# Altium PCB Octo-Electrode.PcbDoc (part 2 of 6)
Units mm, origin at the board's own origin, x right, y up, seen from the top; angles counter-clockwise.
Board outline 202.91 x 135.89 mm, 2 copper layers (Top Layer, Bottom Layer); 289 components, 165 nets, 790 pads, 510 vias.
Unrouted connection lines stored in the file: 83.
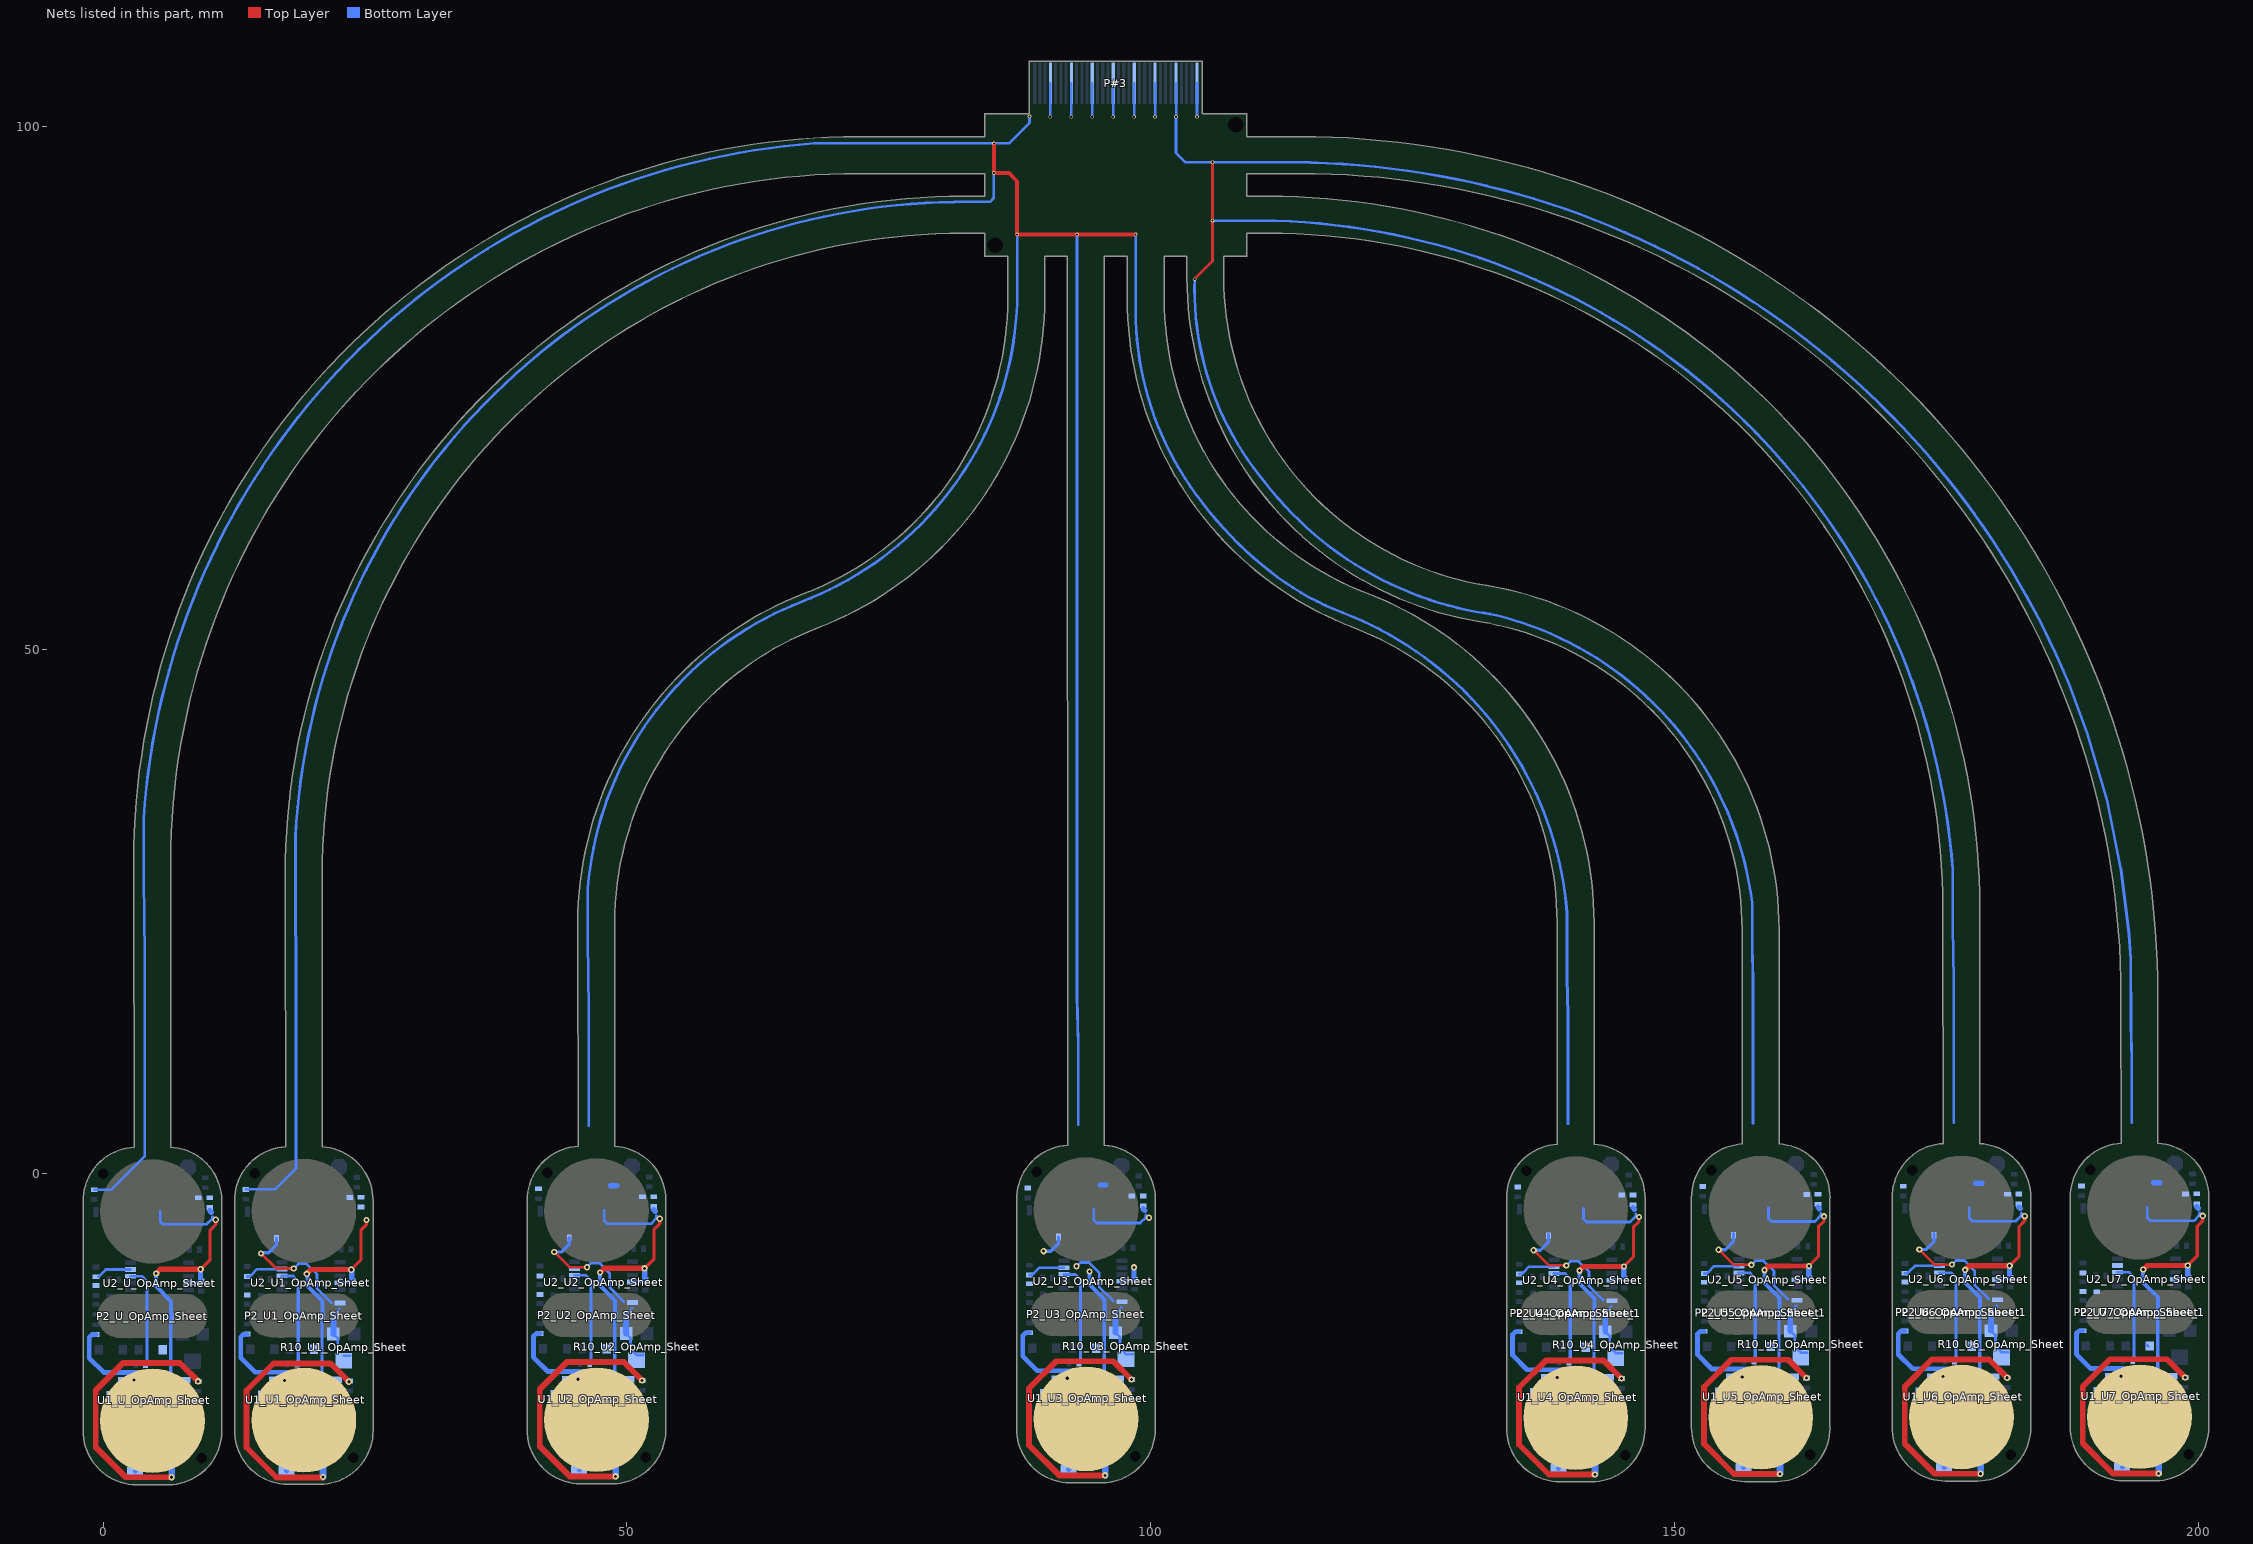
[diagram p2: the nets of this part, all layers, seen from the top]

## Components (designator, comment, footprint, x,y, rotation, side; value= is the part's Value field where it differs from the comment) (continued)
U2_U4_OpAmp_Sheet "TL084CPWR" 14-TSSOP 141.25,-10.172 r0 bottom locked (schematic designator U2)
U2_U5_OpAmp_Sheet "TL084CPWR" 14-TSSOP 158.911,-10.121 r0 bottom (schematic designator U2)
U2_U6_OpAmp_Sheet "TL084CPWR" 14-TSSOP 178.07,-10.096 r0 bottom locked (schematic designator U2)
U2_U7_OpAmp_Sheet "TL084CPWR" 14-TSSOP 195.069,-10.07 r0 bottom locked (schematic designator U2)
U2_U_OpAmp_Sheet "TL084CPWR" 14-TSSOP 5.384,-10.439 r0 bottom locked (schematic designator U2)

## Footprints (in the part's own frame and the unit in brackets; to place one, negate y for a bottom-side part, rotate by r counter-clockwise, add the part's x,y. Pads: shape width x height; smd on the part's side, far side on the other; paste and mask are expansions set on the pad)
14-TSSOP [mm]
  rect 1.05x0.45 smd: 1(-2.775,1.95) 2(-2.775,1.3) 3(-2.775,0.65) 4(-2.775,0) 5(-2.775,-0.65) 6(-2.775,-1.3) 7(-2.775,-1.95) 8(2.775,-1.95) 9(2.775,-1.3) 10(2.775,-0.65) 11(2.775,0) 12(2.775,0.65) 13(2.775,1.3) 14(2.775,1.95)
  silkscreen extent -3.58,-2.54 2.29,2.54, body extent -3.2,-2.5 3.2,2.5, height 1.2
"32 pin Ribbon Pads." [mm]
  rect 0.3x4 smd: 1(7.75,0) 2(7.25,0) 3(6.75,0) 4(6.25,0) 5(5.75,0) 6(5.25,0) 7(4.75,0) 8(4.25,0) 9(3.75,0) 10(3.25,0) 11(2.75,0) 12(2.25,0) 13(1.75,0) 14(1.25,0) 15(0.75,0) 16(0.25,0) 17(-0.25,0) 18(-0.75,0) 19(-1.25,0) 20(-1.75,0) 21(-2.25,0) 22(-2.75,0) 23(-3.25,0) 24(-3.75,0) 25(-4.25,0) 26(-4.75,0) 27(-5.25,0) 28(-5.75,0) 29(-6.25,0) 30(-6.75,0) 31(-7.25,0) 32(-7.75,0)
  silkscreen extent -8.04,-2.54 8.04,2.01
Cap-0402 [mil]
  rect 18x25 smd mask+2.36: 1(-18.5,0) 2(18.5,0)
  silkscreen extent -31,-16 31,16, body extent -20,-10 20,10, height 19
LED-0603 [mm]
  rect 0.5x1 smd: 1(-0.75,0) 2(0.75,0)
  silkscreen extent -1.12,-0.66 1.75,0.66, body extent -0.82,-0.37 0.82,0.36, height 0.68
Res-0402 [mil]
  rect 18x25 smd mask+2.17: 1(-18.5,0) 2(18.5,0)
  silkscreen extent -32,-17 32,16, body extent -23,-11 23,11, height 16
sEMG-sensor [mm]
  round 10 smd: 1(0,9.987) 2(0,-9.987)
  oval 10.5x4.2 smd: 3(0,-0.013)
  silkscreen extent -5.68,-15.21 5.68,15.21
SOD-323 [mm]
  rect 0.8x0.9 smd mask+0.055: 1(-1.15,0) 2(1.15,0)
  silkscreen extent -2.01,-0.79 0.94,0.79, body extent -1.3,-0.67 1.3,0.67, height 1.1
SOIC-8 [mm]
  rect 1.55x0.6 smd: 1(-2.7,1.905) 2(-2.7,0.635) 3(-2.7,-0.635) 4(-2.7,-1.905) 5(2.7,-1.905) 6(2.7,-0.635) 7(2.7,0.635) 8(2.7,1.905)
  silkscreen extent -3.76,-2.49 1.99,2.49, body extent -3,-2.45 3,2.45, height 1.7
"Solder Bridge 0402" [mil]
  rect 18x25 smd mask+2.17: 1(-18.5,0) 2(18.5,0)
  silkscreen extent -32,-17 32,16
TC33X-2-104E_ [mm]
  rect 1.2x1.2 smd: 1(0,0) 3(2,0)
  rect 1.6x1.5 smd: 2(1,2.55)
  silkscreen extent -1.09,-0.71 2.83,3.15, body extent -0.76,-0.64 2.84,3.32, height 1.13
Test-point [mil]
  oct 60x60 smd: 1(0,0)
  silkscreen extent -37,-37 37,37

## Part data
C1_U1_OpAmp_Sheet C1_U2_OpAmp_Sheet C1_U3_OpAmp_Sheet C1_U4_OpAmp_Sheet C1_U5_OpAmp_Sheet C1_U6_OpAmp_Sheet C1_U7_OpAmp_Sheet C1_U7_OpAmp_Sheet_1 C1_U_OpAmp_Sheet C4_U1_OpAmp_Sheet C4_U2_OpAmp_Sheet C4_U3_OpAmp_Sheet C4_U4_OpAmp_Sheet C4_U5_OpAmp_Sheet C4_U6_OpAmp_Sheet C4_U7_OpAmp_Sheet C4_U7_OpAmp_Sheet_1 C4_U_OpAmp_Sheet C6_U1_OpAmp_Sheet C6_U2_OpAmp_Sheet C6_U3_OpAmp_Sheet C6_U4_OpAmp_Sheet C6_U5_OpAmp_Sheet C6_U6_OpAmp_Sheet C6_U7_OpAmp_Sheet C6_U7_OpAmp_Sheet_1 C6_U_OpAmp_Sheet: library part CC0402KRX5R7BB105, "CAP CER 1UF 16V X5R 0402", Case Code (Imperial)=0402, Case Code (Metric)=1005, Dielectric=X5R, LCSC Part Number=C325464, Manufacturer=Yageo, Max Operating Temperature=85°C, Min Operating Temperature=-55°C, Supplier Part Number 1=311-1691-6-ND, Tolerance=10%, Voltage Rating=16V, Capacitance=1uF, Case/Package=0402, ComponentLink1Description=http://www.yageo.com/documents/recent/UPY-GPHC_X5R_4V-to-50V_12.pdf?src-supplier=Avnet+Europe, ComponentLink1URL=http://www.yageo.com/documents/recent/UPY-GPHC_X5R_4V-to-50V_12.pdf?src-supplier=Avnet+Europe, Composition=Ceramic, Depth=0.5mm, Halogen Free="Halogen Free", Height=0.5mm, Item Type=Capacitor, Lead Free="Lead Free", Length=1mm, Manufacturer Part Number=CC0402KRX5R7BB105, Mount="Surface Mount", Packaging="Tape and Reel", Pricing 1="1=0.36, 10=0.252, 100=0.1512, 500=0.1134, 1000=0.09576, 2500=0.09072, 5000=0.08568 (USD)", Radiation Hardening=No, Stock 1=1405667, Supplier 1=Digi-Key, Termination=SMD/SMT, Thickness=0.022inch, Voltage Rating (DC)=16V, Weight=2.3E-05oz, Width=0.02inch
C2_U1_OpAmp_Sheet C2_U2_OpAmp_Sheet C2_U3_OpAmp_Sheet C2_U4_OpAmp_Sheet C2_U5_OpAmp_Sheet C2_U6_OpAmp_Sheet C2_U7_OpAmp_Sheet C2_U7_OpAmp_Sheet_1 C2_U_OpAmp_Sheet C5_U1_OpAmp_Sheet C5_U2_OpAmp_Sheet C5_U3_OpAmp_Sheet C5_U4_OpAmp_Sheet C5_U5_OpAmp_Sheet C5_U6_OpAmp_Sheet C5_U7_OpAmp_Sheet C5_U7_OpAmp_Sheet_1 C5_U_OpAmp_Sheet: library part GRM155R71H104ME14D, "CAP CER 0.1UF 50V X7R 0402", Capacitance=100nF, Case/Package=0402, LCSC Part Number=C182412, Manufacturer=Murata, Max Operating Temperature=125°C, Min Operating Temperature=-55°C, Tolerance=20%, Voltage Rating=50V, Category="Ceramic Capacitors", ComponentLink1Description=http://www.mouser.com/ds/2/281/c02e-2905.pdf?src-supplier=Mouser, ComponentLink1URL=http://www.mouser.com/ds/2/281/c02e-2905.pdf?src-supplier=Mouser, ComponentLink2Description=http://search.murata.co.jp/Ceramy/image/img/A01X/G101/ENG/GRM155R71H104ME14-01.pdf?src-supplier=Digi-Key, ComponentLink2URL=http://search.murata.co.jp/Ceramy/image/img/A01X/G101/ENG/GRM155R71H104ME14-01.pdf?src-supplier=Digi-Key, ComponentLink3Description=http://psearch.en.murata.com/capacitor/product/GRM155R71H104ME14%23.pdf?src-supplier=Avnet, ComponentLink3URL=http://psearch.en.murata.com/capacitor/product/GRM155R71H104ME14%23.pdf?src-supplier=Avnet, Item Type=Capacitor, Length=0.039inch, Manufacturer Part Number=GRM155R71H104ME14D, Mount="Surface Mount", Packaging="Cut Tape", Pricing 1="10000=0.00444, 20000=0.00420, 40000=0.00396, 60000=0.00372, 80000=0.00348, 100000=0.00324, 1000000=0.00300 (USD)", RoHS=Yes, RoHS Compliant=Yes, Stock 1=100000, Supplier 1=Avnet, Supplier Part Number 1=GRM155R71H104ME14D, Thickness=0.022inch, Width=0.02inch
C3_U1_OpAmp_Sheet C3_U2_OpAmp_Sheet C3_U3_OpAmp_Sheet C3_U4_OpAmp_Sheet C3_U5_OpAmp_Sheet C3_U6_OpAmp_Sheet C3_U7_OpAmp_Sheet C3_U_OpAmp_Sheet: library part CC0402KRX7R9BB103, "CAP CER 10000PF 50V X7R 0402", Case Code (Imperial)=0402, Case Code (Metric)=1005, Dielectric=X7R, LCSC Part Number=C60133, Manufacturer=Yageo, Max Operating Temperature=125°C, Min Operating Temperature=-55°C, Package Quantity=1, Resistor Type=Ceramic, Tolerance=10%, Voltage=50V, Capacitance=10nF, Case/Package=0402, Category="Ceramic Capacitors", ComponentLink1Description=https://datasheet.ciiva.com/11788/0900766b8079c870-11788375.pdf?src-supplier=RSComponents, ComponentLink1URL=https://datasheet.ciiva.com/11788/0900766b8079c870-11788375.pdf?src-supplier=RSComponents, ComponentLink2Description=https://datasheet.ciiva.com/26862/getdatasheetpartid-138248-26862642.pdf?src-supplier=Verical, ComponentLink2URL=https://datasheet.ciiva.com/26862/getdatasheetpartid-138248-26862642.pdf?src-supplier=Verical, ComponentLink3Description=https://datasheet.ciiva.com/7978/1489800-7978093.pdf?src-supplier=Element14, ComponentLink3URL=https://datasheet.ciiva.com/7978/1489800-7978093.pdf?src-supplier=Element14, ComponentLink4Description=https://datasheet.ciiva.com/28450/1489800-28450377.pdf?src-supplier=Element14, ComponentLink4URL=https://datasheet.ciiva.com/28450/1489800-28450377.pdf?src-supplier=Element14, ComponentLink5Description=https://datasheet.ciiva.com/176/mlccorderingcode-176349.pdf?src-supplier=Digi-Key, ComponentLink5URL=https://datasheet.ciiva.com/176/mlccorderingcode-176349.pdf?src-supplier=Digi-Key, ComponentLink6Description=https://datasheet.ciiva.com/176/mlccorderingcode-176348.pdf?src-supplier=Digi-Key, ComponentLink6URL=https://datasheet.ciiva.com/176/mlccorderingcode-176348.pdf?src-supplier=Digi-Key, ComponentLink7Description=https://datasheet.ciiva.com/176/mlccorderingcode-176350.pdf?src-supplier=Digi-Key, ComponentLink7URL=https://datasheet.ciiva.com/176/mlccorderingcode-176350.pdf?src-supplier=Digi-Key, Depth=0.5mm, Halogen Free="Halogen Free", Height=0.5mm, Item Type=Capacitor, Lead Free="Lead Free", Length=1mm, Manufacturer Part Number=CC0402KRX7R9BB103, Mount="Surface Mount", Packaging="Tape and Reel", Pricing 1="10000=0.00178 (USD)", Radiation Hardening=No, Reach SVHC Compliant=Yes, RoHS=Yes, RoHS Compliant=Yes, Series=CC, Stock 1=995000, Supplier 1=Avnet, Supplier Part Number 1=CC0402KRX7R9BB103, Termination=SMD/SMT, Thickness=0.022inch, Voltage Rating=50V, Voltage Rating (DC)=50V, Width=0.02inch
D1_U1_OpAmp_Sheet D1_U2_OpAmp_Sheet D1_U3_OpAmp_Sheet D1_U4_OpAmp_Sheet D1_U5_OpAmp_Sheet D1_U6_OpAmp_Sheet D1_U7_OpAmp_Sheet D1_U_OpAmp_Sheet D2_U1_OpAmp_Sheet D2_U2_OpAmp_Sheet D2_U3_OpAmp_Sheet D2_U4_OpAmp_Sheet D2_U5_OpAmp_Sheet D2_U6_OpAmp_Sheet D2_U7_OpAmp_Sheet D2_U_OpAmp_Sheet: "DIODE GEN PURP 75V 150MA SOD323", Average Rectified Current=150mA, Capacitance=2pF, Forward Current=300mA, Forward Voltage=1.25V, LCSC Part Number=C60580, Manufacturer=Diodes, Max Forward Surge Current (Ifsm)=2A, Max Operating Temperature=150°C, Max Repetitive Reverse Voltage (Vrrm)=75V, Max Reverse Current=1uA, Min Operating Temperature=-65°C, Package Quantity=3000, Power Dissipation=200mW, Supplier Part Number 1=621-1N4148WS-F, Category="Rectifier Diodes", ComponentLink1Description=https://datasheet.ciiva.com/1179/ds30097-1179355.pdf?src-supplier=Element14, ComponentLink1URL=https://datasheet.ciiva.com/1179/ds30097-1179355.pdf?src-supplier=Element14, ComponentLink2Description=https://datasheet.ciiva.com/8300/ds30097-8300396.pdf?src-supplier=Avnet, ComponentLink2URL=https://datasheet.ciiva.com/8300/ds30097-8300396.pdf?src-supplier=Avnet, ComponentLink3Description=https://datasheet.ciiva.com/16199/ds30097-16199061.pdf?src-supplier=Future+Electronics, ComponentLink3URL=https://datasheet.ciiva.com/16199/ds30097-16199061.pdf?src-supplier=Future+Electronics, ComponentLink4Description=https://datasheet.ciiva.com/911/ds30097-911742.pdf?src-supplier=Digi-Key, ComponentLink4URL=https://datasheet.ciiva.com/911/ds30097-911742.pdf?src-supplier=Digi-Key, ComponentLink5Description=https://datasheet.ciiva.com/911/ds30097-911743.pdf?src-supplier=Digi-Key, ComponentLink5URL=https://datasheet.ciiva.com/911/ds30097-911743.pdf?src-supplier=Digi-Key, ComponentLink6Description=https://datasheet.ciiva.com/911/ds30097-911741.pdf?src-supplier=Digi-Key, ComponentLink6URL=https://datasheet.ciiva.com/911/ds30097-911741.pdf?src-supplier=Digi-Key, Contact Plating=Tin,Matte, Current Rating=150mA, Element Configuration=Single, Height=1mm, Item Type=Diode, Lead Free="Lead Free", Length=1.8mm, Manufacturer Part Number=1N4148WS-7-F, Max Reverse Voltage (DC)=75V, Max Surge Current=2A, Mount="Surface Mount", Number of Pins=2, Output Current=150mA, Packaging="Tape and Reel", Peak Non-Repetitive Surge Current=2A, Polarity=Standard, Power Rating=200mW, Pricing 1="1=0.19000, 10=0.17500, 50=0.17500, 100=0.09600, 500=0.05900, 1000=0.04000, 3000=0.03000, 9000=0.02600, 10000=0.02600, 24000=0.02300, 45000=0.01900 (USD)", Radiation Hardening=No, REACH SVHC="No SVHC", Recovery Time=4ns, Reverse Recovery Time=4ns, Reverse Recovery Time-Max=4ns, RoHS=Yes, RoHS Compliant=Yes, Series=-, Supplier 1=Mouser, Voltage=75V, Voltage Rating (DC)=75V, Weight=0.000173oz, Width=1.4mm
LED1_U1_OpAmp_Sheet LED1_U2_OpAmp_Sheet LED1_U3_OpAmp_Sheet LED1_U4_OpAmp_Sheet LED1_U5_OpAmp_Sheet LED1_U6_OpAmp_Sheet LED1_U7_OpAmp_Sheet LED1_U7_OpAmp_Sheet_1 LED1_U_OpAmp_Sheet: library part 19-217/S2C-AQ1R1B/3T, "0603(H=0.4mm) λD=600.5~612.5nm VR=5V VF=1.7V~2.2V IF=25mA PD=60mW", LCSC Part Number=C146215, Manufacturer=Everlight, Supplier Part Number 1=1080-19-217/S2C-AQ1R1B/3TTR-ND, Category=LEDs, ComponentLink1Description=LCSC, ComponentLink1URL=https://www.lcsc.com/product-detail/Light-Emitting-Diodes-LED_Everlight-Elec-19-217-S2C-AQ1R1B-3T_C146215.html, Item Type=LED, Manufacturer Part Number=19-217/S2C-AQ1R1B/3T, RoHS=No, Supplier 1=Digi-Key
P1_U1_OpAmp_Sheet P1_U2_OpAmp_Sheet P1_U3_OpAmp_Sheet P1_U4_OpAmp_Sheet P1_U5_OpAmp_Sheet P1_U6_OpAmp_Sheet P1_U7_OpAmp_Sheet P1_U_OpAmp_Sheet P3_U1_OpAmp_Sheet P3_U2_OpAmp_Sheet P3_U3_OpAmp_Sheet P3_U4_OpAmp_Sheet P3_U5_OpAmp_Sheet P3_U6_OpAmp_Sheet P3_U7_OpAmp_Sheet P3_U_OpAmp_Sheet: library part "TEST POINT", "Test Point ON", Item Type="TEST POINT"
P2_U1_OpAmp_Sheet P2_U2_OpAmp_Sheet P2_U3_OpAmp_Sheet P2_U4_OpAmp_Sheet P2_U4_OpAmp_Sheet_1 P2_U5_OpAmp_Sheet P2_U5_OpAmp_Sheet_1 P2_U6_OpAmp_Sheet P2_U6_OpAmp_Sheet_1 P2_U7_OpAmp_Sheet P2_U7_OpAmp_Sheet_1 P2_U_OpAmp_Sheet: "Sensor Connecting Pads"
P#3: "Ribbon wire Connection Pads"
R1_U1_OpAmp_Sheet R1_U2_OpAmp_Sheet R1_U3_OpAmp_Sheet R1_U4_OpAmp_Sheet R1_U5_OpAmp_Sheet R1_U6_OpAmp_Sheet R1_U7_OpAmp_Sheet R1_U7_OpAmp_Sheet_1 R1_U_OpAmp_Sheet R11_U1_OpAmp_Sheet R11_U2_OpAmp_Sheet R11_U3_OpAmp_Sheet R11_U4_OpAmp_Sheet R11_U5_OpAmp_Sheet R11_U6_OpAmp_Sheet R11_U7_OpAmp_Sheet R11_U7_OpAmp_Sheet_1 R11_U_OpAmp_Sheet: library part RC0402JR-071KL, "RES 1K OHM 5% 1/16W 0402", Case Code (Imperial)=0402, Case Code (Metric)=1005, LCSC Part Number=C105637, Manufacturer=Yageo, Max Operating Temperature=155°C, Max Power Dissipation=63mW, Min Operating Temperature=-55°C, Package Quantity=1, Power Rating=62.5mW, Resistance=1kR, Resistance Tolerance=5%, Resistor Type="Thick Film", Supplier Part Number 1=311-1.0KJRCT-ND, Temperature Coefficient=100ppm/°C, Voltage Rating=50V, Case/Package=0402, Category="Chip SMD Resistors", ComponentLink1Description=https://datasheet.ciiva.com/7983/1018594-7983558.pdf?src-supplier=Element14, ComponentLink1URL=https://datasheet.ciiva.com/7983/1018594-7983558.pdf?src-supplier=Element14, ComponentLink2Description=https://datasheet.ciiva.com/2452/pyu-r-int-thick-7-2452756.pdf?src-supplier=Digi-Key, ComponentLink2URL=https://datasheet.ciiva.com/2452/pyu-r-int-thick-7-2452756.pdf?src-supplier=Digi-Key, ComponentLink3Description=https://datasheet.ciiva.com/2452/pyu-r-int-thick-7-2452757.pdf?src-supplier=Digi-Key, ComponentLink3URL=https://datasheet.ciiva.com/2452/pyu-r-int-thick-7-2452757.pdf?src-supplier=Digi-Key, ComponentLink4Description=https://datasheet.ciiva.com/2452/pyu-r-int-thick-7-2452755.pdf?src-supplier=Digi-Key, ComponentLink4URL=https://datasheet.ciiva.com/2452/pyu-r-int-thick-7-2452755.pdf?src-supplier=Digi-Key, ComponentLink5Description=https://datasheet.ciiva.com/7850/1018594-7850170.pdf?src-supplier=Element14, ComponentLink5URL=https://datasheet.ciiva.com/7850/1018594-7850170.pdf?src-supplier=Element14, ComponentLink6Description=https://datasheet.ciiva.com/7850/1018594-7850171.pdf?src-supplier=Element14, ComponentLink6URL=https://datasheet.ciiva.com/7850/1018594-7850171.pdf?src-supplier=Element14, ComponentLink7Description=https://datasheet.ciiva.com/17081/pyu-rc0402-51-rohs-l-6-r-17081438.pdf?src-supplier=Future+Electronics, ComponentLink7URL=https://datasheet.ciiva.com/17081/pyu-rc0402-51-rohs-l-6-r-17081438.pdf?src-supplier=Future+Electronics, Construction=Rectangular, Depth=0.5mm, Features="Moisture Resistant", Height=0.016inch, Item Type=Resistor, Lead Free="Lead Free", Length=0.039inch, Manufacturer Part Number=RC0402JR-071KL, Military Standard=Not, Number of Terminations=2, Packaging="Tape and Reel", Pricing 1="1=0.10000, 10=0.01300, 100=0.00540, 1000=0.00244, 2500=0.00212, 5000=0.00175 (USD)", REACH SVHC="No SVHC", RoHS=Yes, RoHS Compliant=Yes, Series=RC, Size Code=0402, Stock 1=452315, Supplier 1=Digi-Key, Termination=SMD/SMT, Tolerance=5%, Width=0.02inch
R2_U1_OpAmp_Sheet R2_U2_OpAmp_Sheet R2_U3_OpAmp_Sheet R2_U4_OpAmp_Sheet R2_U5_OpAmp_Sheet R2_U6_OpAmp_Sheet R2_U7_OpAmp_Sheet R2_U_OpAmp_Sheet: library part RC0402FR-07240RL, "RES 240 OHM 1% 1/16W 0402", Case Code (Imperial)=0402, Case Code (Metric)=1005, Manufacturer=Yageo, Max Operating Temperature=155°C, Max Power Dissipation=63mW, Min Operating Temperature=-55°C, Package Quantity=1, Resistance Tolerance=1%, Resistor Type="Thick Film", Supplier Part Number 1=603-RC0402FR-07240RL, Temperature Coefficient=100ppm/°C, Voltage Rating=50V, Case/Package=0402, Category="Chip SMD Resistors", ComponentLink1Description=https://datasheet.ciiva.com/7849/1018594-7849915.pdf?src-supplier=Element14, ComponentLink1URL=https://datasheet.ciiva.com/7849/1018594-7849915.pdf?src-supplier=Element14, ComponentLink2Description=https://datasheet.ciiva.com/7849/1018594-7849916.pdf?src-supplier=Element14, ComponentLink2URL=https://datasheet.ciiva.com/7849/1018594-7849916.pdf?src-supplier=Element14, ComponentLink3Description=https://datasheet.ciiva.com/2519/pyu-r-int-thick-7-2519157.pdf?src-supplier=Digi-Key, ComponentLink3URL=https://datasheet.ciiva.com/2519/pyu-r-int-thick-7-2519157.pdf?src-supplier=Digi-Key, ComponentLink4Description=https://datasheet.ciiva.com/2519/pyu-r-int-thick-7-2519158.pdf?src-supplier=Digi-Key, ComponentLink4URL=https://datasheet.ciiva.com/2519/pyu-r-int-thick-7-2519158.pdf?src-supplier=Digi-Key, ComponentLink5Description=https://datasheet.ciiva.com/2519/pyu-r-int-thick-7-2519156.pdf?src-supplier=Digi-Key, ComponentLink5URL=https://datasheet.ciiva.com/2519/pyu-r-int-thick-7-2519156.pdf?src-supplier=Digi-Key, ComponentLink6Description=https://datasheet.ciiva.com/12669/pyu-rc0402-51-rohs-l-6-r-12669689.pdf?src-supplier=Mouser, ComponentLink6URL=https://datasheet.ciiva.com/12669/pyu-rc0402-51-rohs-l-6-r-12669689.pdf?src-supplier=Mouser, ComponentLink7Description=https://datasheet.ciiva.com/17419/pyu-rc0402-51-rohs-l-6-r-17419482.pdf?src-supplier=Future+Electronics, ComponentLink7URL=https://datasheet.ciiva.com/17419/pyu-rc0402-51-rohs-l-6-r-17419482.pdf?src-supplier=Future+Electronics, Construction=Rectangular, Depth=0.5mm, Features="Moisture Resistant", Height=0.016inch, Lead Free="Lead Free", Length=1mm, Manufacturer Part Number=RC0402FR-07240RL, Military Standard=Not, Number of Terminations=2, Packaging="Tape and Reel", Power Rating=63mW, Pricing 1="1=0.10000, 10=0.01200, 50=0.01200, 100=0.00500, 1000=0.00300, 10000=0.00100 (USD)", REACH SVHC=Unknown, Resistance=240R, RoHS=Yes, RoHS Compliant=Yes, Series=RC, Size Code=0402, Stock 1=1903202, Supplier 1=Mouser, Termination=SMD/SMT, Tolerance=1%, Voltage Rating (DC)=50V, Width=0.02inch
R3_U1_OpAmp_Sheet R3_U2_OpAmp_Sheet R3_U3_OpAmp_Sheet R3_U4_OpAmp_Sheet R3_U5_OpAmp_Sheet R3_U6_OpAmp_Sheet R3_U7_OpAmp_Sheet R3_U_OpAmp_Sheet R4_U1_OpAmp_Sheet R4_U2_OpAmp_Sheet R4_U3_OpAmp_Sheet R4_U4_OpAmp_Sheet R4_U5_OpAmp_Sheet R4_U6_OpAmp_Sheet R4_U7_OpAmp_Sheet R4_U7_OpAmp_Sheet_1 R4_U_OpAmp_Sheet R5_U1_OpAmp_Sheet R5_U2_OpAmp_Sheet R5_U3_OpAmp_Sheet R5_U4_OpAmp_Sheet R5_U5_OpAmp_Sheet R5_U6_OpAmp_Sheet R5_U7_OpAmp_Sheet R5_U_OpAmp_Sheet R6_U1_OpAmp_Sheet R6_U2_OpAmp_Sheet R6_U3_OpAmp_Sheet R6_U4_OpAmp_Sheet R6_U5_OpAmp_Sheet R6_U6_OpAmp_Sheet R6_U7_OpAmp_Sheet R6_U_OpAmp_Sheet R7_U1_OpAmp_Sheet R7_U2_OpAmp_Sheet R7_U3_OpAmp_Sheet R7_U4_OpAmp_Sheet R7_U5_OpAmp_Sheet R7_U6_OpAmp_Sheet R7_U7_OpAmp_Sheet R7_U7_OpAmp_Sheet_1 R7_U_OpAmp_Sheet: library part RC0402JR-07150KL, "RES SMD 0402 150kOhm 5% Paper T/R", Case Code (Imperial)=0402, Case Code (Metric)=1005, LCSC Part Number=C137919, Manufacturer=Yageo, Max Operating Temperature=155°C, Max Power Dissipation=63mW, Min Operating Temperature=-55°C, Package Quantity=1, Resistance=150kR, Resistance Tolerance=5%, Resistor Type="Thick Film", Temperature Coefficient=100ppm/°C, Voltage Rating=50V, Case/Package=0402, Category="Chip SMD Resistors", ComponentLink1Description=https://datasheet.ciiva.com/7983/1018594-7983551.pdf?src-supplier=Element14, ComponentLink1URL=https://datasheet.ciiva.com/7983/1018594-7983551.pdf?src-supplier=Element14, ComponentLink2Description=https://datasheet.ciiva.com/2518/pyu-r-int-thick-7-2518929.pdf?src-supplier=Digi-Key, ComponentLink2URL=https://datasheet.ciiva.com/2518/pyu-r-int-thick-7-2518929.pdf?src-supplier=Digi-Key, ComponentLink3Description=https://datasheet.ciiva.com/2518/pyu-r-int-thick-7-2518930.pdf?src-supplier=Digi-Key, ComponentLink3URL=https://datasheet.ciiva.com/2518/pyu-r-int-thick-7-2518930.pdf?src-supplier=Digi-Key, ComponentLink4Description=https://datasheet.ciiva.com/2518/pyu-r-int-thick-7-2518928.pdf?src-supplier=Digi-Key, ComponentLink4URL=https://datasheet.ciiva.com/2518/pyu-r-int-thick-7-2518928.pdf?src-supplier=Digi-Key, ComponentLink5Description=https://datasheet.ciiva.com/7850/1018594-7850149.pdf?src-supplier=Element14, ComponentLink5URL=https://datasheet.ciiva.com/7850/1018594-7850149.pdf?src-supplier=Element14, ComponentLink6Description=https://datasheet.ciiva.com/17072/pyu-rc0402-51-rohs-l-6-r-17072379.pdf?src-supplier=Future+Electronics, ComponentLink6URL=https://datasheet.ciiva.com/17072/pyu-rc0402-51-rohs-l-6-r-17072379.pdf?src-supplier=Future+Electronics, ComponentLink7Description=https://datasheet.ciiva.com/15189/getdatasheetpartid-251830-15189543.pdf?src-supplier=Verical, ComponentLink7URL=https://datasheet.ciiva.com/15189/getdatasheetpartid-251830-15189543.pdf?src-supplier=Verical, Construction=Rectangular, Depth=0.5mm, Features="Moisture Resistant", Height=0.016inch, Item Type=Resistor, Lead Free="Lead Free", Length=1mm, Manufacturer Part Number=RC0402JR-07150KL, Military Standard=Not, Number of Terminations=2, Packaging="Tape and Reel", Power Rating=63mW, Pricing 1="10000=0.00100 (USD)", REACH SVHC="No SVHC", RoHS=Yes, RoHS Compliant=Yes, Series=RC, Size Code=0402, Stock 1=170000, Supplier 1="Arrow Electronics", Supplier Part Number 1=RC0402JR-07150KL, Termination=SMD/SMT, Tolerance=5%, Weight=2.3E-05oz, Width=0.02inch
R8_U1_OpAmp_Sheet R8_U2_OpAmp_Sheet R8_U3_OpAmp_Sheet R8_U4_OpAmp_Sheet R8_U5_OpAmp_Sheet R8_U6_OpAmp_Sheet R8_U7_OpAmp_Sheet R8_U7_OpAmp_Sheet_1 R8_U_OpAmp_Sheet R9_U1_OpAmp_Sheet R9_U2_OpAmp_Sheet R9_U3_OpAmp_Sheet R9_U4_OpAmp_Sheet R9_U5_OpAmp_Sheet R9_U6_OpAmp_Sheet R9_U7_OpAmp_Sheet R9_U7_OpAmp_Sheet_1 R9_U_OpAmp_Sheet: library part RC-02W8062FT, "1/16W 50V ±1% ±200ppm/℃ -55℃~+155℃ 80.6kΩ 0402 Chip Resistor - Surface Mount ROHS", LCSC Part Number=C304637, Manufacturer=FH, ComponentLink1Description=LCSC, ComponentLink1URL=https://www.lcsc.com/product-detail/Chip-Resistor-Surface-Mount_FH-Guangdong-Fenghua-Advanced-Tech-RC-02W8062FT_C304637.html, Item Type=Resistor, Manufacture Part Number=RC-02W8062FT
R10_U1_OpAmp_Sheet R10_U2_OpAmp_Sheet R10_U3_OpAmp_Sheet R10_U4_OpAmp_Sheet R10_U5_OpAmp_Sheet R10_U6_OpAmp_Sheet R10_U7_OpAmp_Sheet R10_U_OpAmp_Sheet: "TRIMMER 100K OHM 0.1W J LEAD TOP", Color=Silver, LCSC Part Number=C719186, Manufacturer=Bourns, Max Operating Temperature=100°C, Max Power Dissipation=100mW, Min Operating Temperature=-40°C, Package Quantity=2500, Resistance=100kR, Resistance Tolerance=25%, Resistor Type=Carbon,Cermet, Temperature Coefficient=250ppm/°C, Voltage Rating (DC)=50V, Category="Variable Resistors and Potentiometers", ComponentLink1Description=https://datasheet.ciiva.com/11832/0900766b802749b3-11832506.pdf?src-supplier=RSComponents, ComponentLink1URL=https://datasheet.ciiva.com/11832/0900766b802749b3-11832506.pdf?src-supplier=RSComponents, ComponentLink2Description=https://datasheet.ciiva.com/8700/tc33-8700395.pdf?src-supplier=Avnet, ComponentLink2URL=https://datasheet.ciiva.com/8700/tc33-8700395.pdf?src-supplier=Avnet, ComponentLink3Description=https://datasheet.ciiva.com/2155/tc33-2155965.pdf?src-supplier=Digi-Key, ComponentLink3URL=https://datasheet.ciiva.com/2155/tc33-2155965.pdf?src-supplier=Digi-Key, ComponentLink4Description=https://datasheet.ciiva.com/7953/1818686-7953181.pdf?src-supplier=Element14, ComponentLink4URL=https://datasheet.ciiva.com/7953/1818686-7953181.pdf?src-supplier=Element14, ComponentLink5Description=https://datasheet.ciiva.com/16716/70155234-16716301.pdf?src-supplier=Allied+Electronics, ComponentLink5URL=https://datasheet.ciiva.com/16716/70155234-16716301.pdf?src-supplier=Allied+Electronics, ComponentLink6Description=https://datasheet.ciiva.com/2155/tc33-2155966.pdf?src-supplier=Digi-Key, ComponentLink6URL=https://datasheet.ciiva.com/2155/tc33-2155966.pdf?src-supplier=Digi-Key, ComponentLink7Description=https://datasheet.ciiva.com/7953/1818686-7953182.pdf?src-supplier=Element14, ComponentLink7URL=https://datasheet.ciiva.com/7953/1818686-7953182.pdf?src-supplier=Element14, ComponentLink8Description=https://datasheet.ciiva.com/2155/tc33-2155967.pdf?src-supplier=Digi-Key, ComponentLink8URL=https://datasheet.ciiva.com/2155/tc33-2155967.pdf?src-supplier=Digi-Key, Depth=3.8mm, Height=0.047inch, Item Type=Trimmer, Length=3mm, Manufacturer Part Number=TC33X-2-104E, Military Standard=Not, Mount="Surface Mount", Number of Turns=1, Packaging="Tape and Reel", Power Rating=100mW, Pricing 1="2500=0.15500, 5000=0.13130 (USD)", Radiation Hardening=No, REACH SVHC="No SVHC", RoHS=Yes, RoHS Compliant=Yes, Series=TC33, Stock 1=12500, Supplier 1="Arrow Electronics", Supplier Part Number 1=TC33X-2-104E, Termination="Foot Print", Tolerance=25%, Weight=29.4mg, Width=0.118inch
SB1_U1_OpAmp_Sheet SB1_U2_OpAmp_Sheet SB1_U3_OpAmp_Sheet SB1_U4_OpAmp_Sheet SB1_U5_OpAmp_Sheet SB1_U6_OpAmp_Sheet SB1_U7_OpAmp_Sheet SB1_U7_OpAmp_Sheet_1 SB1_U_OpAmp_Sheet SB2_U1_OpAmp_Sheet SB2_U2_OpAmp_Sheet SB2_U3_OpAmp_Sheet SB2_U4_OpAmp_Sheet SB2_U5_OpAmp_Sheet SB2_U6_OpAmp_Sheet SB2_U7_OpAmp_Sheet SB2_U7_OpAmp_Sheet_1 SB2_U_OpAmp_Sheet SB3_U1_OpAmp_Sheet SB3_U2_OpAmp_Sheet SB3_U3_OpAmp_Sheet SB3_U4_OpAmp_Sheet SB3_U5_OpAmp_Sheet SB3_U6_OpAmp_Sheet SB3_U7_OpAmp_Sheet SB3_U7_OpAmp_Sheet_1 SB3_U_OpAmp_Sheet SB4_U1_OpAmp_Sheet SB4_U2_OpAmp_Sheet SB4_U3_OpAmp_Sheet SB4_U4_OpAmp_Sheet SB4_U5_OpAmp_Sheet SB4_U6_OpAmp_Sheet SB4_U7_OpAmp_Sheet SB4_U7_OpAmp_Sheet_1 SB4_U_OpAmp_Sheet SB5_U1_OpAmp_Sheet SB5_U2_OpAmp_Sheet SB5_U3_OpAmp_Sheet SB5_U4_OpAmp_Sheet SB5_U5_OpAmp_Sheet SB5_U6_OpAmp_Sheet SB5_U7_OpAmp_Sheet SB5_U7_OpAmp_Sheet_1 SB5_U_OpAmp_Sheet SB6_U1_OpAmp_Sheet SB6_U2_OpAmp_Sheet SB6_U3_OpAmp_Sheet SB6_U4_OpAmp_Sheet SB6_U5_OpAmp_Sheet SB6_U6_OpAmp_Sheet SB6_U7_OpAmp_Sheet SB6_U7_OpAmp_Sheet_1 SB6_U_OpAmp_Sheet SB7_U1_OpAmp_Sheet SB7_U2_OpAmp_Sheet SB7_U3_OpAmp_Sheet SB7_U4_OpAmp_Sheet SB7_U5_OpAmp_Sheet SB7_U6_OpAmp_Sheet SB7_U7_OpAmp_Sheet SB7_U7_OpAmp_Sheet_1 SB7_U_OpAmp_Sheet SB8_U1_OpAmp_Sheet SB8_U2_OpAmp_Sheet SB8_U3_OpAmp_Sheet SB8_U4_OpAmp_Sheet SB8_U5_OpAmp_Sheet SB8_U6_OpAmp_Sheet SB8_U7_OpAmp_Sheet SB8_U7_OpAmp_Sheet_1 SB8_U_OpAmp_Sheet: "Solder Bridge ON"
U1_U1_OpAmp_Sheet U1_U2_OpAmp_Sheet U1_U3_OpAmp_Sheet U1_U4_OpAmp_Sheet U1_U5_OpAmp_Sheet U1_U6_OpAmp_Sheet U1_U7_OpAmp_Sheet U1_U_OpAmp_Sheet: "IC OPAMP INSTR 825KHZ 8SOIC", Case/Package=SOIC, Input Bias Current=1.5nA, Input Offset Voltage (Vos)=60uV, Input Resistance=100GR, LCSC Part Number=C13342, Manufacturer="Analog Devices", Max Dual Supply Voltage=18V, Max Operating Temperature=85°C, Max Power Dissipation=200mW, Min Dual Supply Voltage=2.3V, Min Operating Temperature=-40°C, Nominal Supply Current=1mA, Operating Supply Voltage=36V, Output Current per Channel=18mA, Package Quantity=1000, Power Supply Rejection Ratio (PSRR)=130dB, Quiescent Current=900uA, Supplier Part Number 1=584-AD8221ARZ-R7, Voltage Gain=60dB, -3db Bandwidth=825kHz, Bandwidth=562kHz, Category="Amplifiers - Op Amps, Buffer, Instrumentation", Common Mode Rejection Ratio=80dB, ComponentLink1Description=https://datasheet.ciiva.com/15128/getdatasheetpartid-313520-15128733.pdf?src-supplier=Verical, ComponentLink1URL=https://datasheet.ciiva.com/15128/getdatasheetpartid-313520-15128733.pdf?src-supplier=Verical, ComponentLink2Description=https://datasheet.ciiva.com/2975/ad8221-2975658.pdf?src-supplier=Avnet, ComponentLink2URL=https://datasheet.ciiva.com/2975/ad8221-2975658.pdf?src-supplier=Avnet, ComponentLink3Description=https://datasheet.ciiva.com/2975/ad8221-2975980.pdf?src-supplier=Avnet, ComponentLink3URL=https://datasheet.ciiva.com/2975/ad8221-2975980.pdf?src-supplier=Avnet, ComponentLink4Description=https://datasheet.ciiva.com/6628/ad8221-6628618.pdf?src-supplier=Digi-Key, ComponentLink4URL=https://datasheet.ciiva.com/6628/ad8221-6628618.pdf?src-supplier=Digi-Key, ComponentLink5Description=https://datasheet.ciiva.com/6628/ad8221-6628619.pdf?src-supplier=Digi-Key, ComponentLink5URL=https://datasheet.ciiva.com/6628/ad8221-6628619.pdf?src-supplier=Digi-Key, ComponentLink6Description=https://datasheet.ciiva.com/6628/ad8221-6628617.pdf?src-supplier=Digi-Key, ComponentLink6URL=https://datasheet.ciiva.com/6628/ad8221-6628617.pdf?src-supplier=Digi-Key, ComponentLink7Description=https://datasheet.ciiva.com/48709/001249009-da-01-en-ic-amp-inst-prec-ad8221arz-r7-soic-8-adi-48709526.pdf?src-supplier=Conrad, ComponentLink7URL=https://datasheet.ciiva.com/48709/001249009-da-01-en-ic-amp-inst-prec-ad8221arz-r7-soic-8-adi-48709526.pdf?src-supplier=Conrad, Contact Plating=Tin,Matte, Item Type=IC, Lead Free="Contains Lead", Manufacturer Part Number=AD8221ARZ-R7, Number of Channels=1, Number of Circuits=1, Number of Elements=1, Number of Pins=8, Operating Supply Current=1mA, Packaging="Tape and Reel", Power Dissipation=200mW, Pricing 1="1=7.37000, 10=6.66000, 25=6.35000, 50=6.35000, 100=5.51000, 250=5.27000, 500=4.80000, 1000=4.37000, 10000=4.37000 (USD)", Radiation Hardening=No, RoHS=Yes, RoHS Compliant=Yes, Series=-, Slew Rate=2.5V/µs, Supplier 1=Mouser, Supply Current=1mA
U2_U1_OpAmp_Sheet U2_U2_OpAmp_Sheet U2_U3_OpAmp_Sheet U2_U4_OpAmp_Sheet U2_U5_OpAmp_Sheet U2_U6_OpAmp_Sheet U2_U7_OpAmp_Sheet U2_U_OpAmp_Sheet: "IC OPAMP JFET 4 CIRCUIT 14TSSOP", Case/Package=TSSOP, Input Bias Current=400pA, Input Offset Voltage (Vos)=15mV, Manufacturer="Texas Instruments", Max Dual Supply Voltage=18V, Max Operating Temperature=125°C, Max Power Dissipation=680mW, Min Dual Supply Voltage=3.5V, Min Operating Temperature=-40°C, Min Supply Voltage=7V, Nominal Supply Current=11.2mA, Operating Supply Current=1.4mA, Package Quantity=1, Quiescent Current=2.8A, Supplier Part Number 1=595-TL084CPWR, Voltage Gain=106.02dB, Bandwidth=3MHz, Category="Amplifiers - Op Amps, Buffer, Instrumentation", Common Mode Rejection Ratio=70dB, ComponentLink1Description=https://datasheet.ciiva.com/34301/1064719-34301936.pdf?src-supplier=Jameco, ComponentLink1URL=https://datasheet.ciiva.com/34301/1064719-34301936.pdf?src-supplier=Jameco, ComponentLink2Description=https://datasheet.ciiva.com/1795/tl081a-1795644.pdf?src-supplier=Digi-Key, ComponentLink2URL=https://datasheet.ciiva.com/1795/tl081a-1795644.pdf?src-supplier=Digi-Key, ComponentLink3Description=https://datasheet.ciiva.com/1795/tl081a-1795643.pdf?src-supplier=Digi-Key, ComponentLink3URL=https://datasheet.ciiva.com/1795/tl081a-1795643.pdf?src-supplier=Digi-Key, ComponentLink4Description=https://datasheet.ciiva.com/1795/tl081a-1795645.pdf?src-supplier=Digi-Key, ComponentLink4URL=https://datasheet.ciiva.com/1795/tl081a-1795645.pdf?src-supplier=Digi-Key, ComponentLink5Description=https://datasheet.ciiva.com/14459/tl082-14459749.pdf?src-supplier=Avnet, ComponentLink5URL=https://datasheet.ciiva.com/14459/tl082-14459749.pdf?src-supplier=Avnet, ComponentLink6Description=https://datasheet.ciiva.com/48707/001072249-da-01-en-ic-opamp-jfet-3mh-tl084cpwr-tssop-14-tid-48707867.pdf?src-supplier=Conrad, ComponentLink6URL=https://datasheet.ciiva.com/48707/001072249-da-01-en-ic-opamp-jfet-3mh-tl084cpwr-tssop-14-tid-48707867.pdf?src-supplier=Conrad, Contact Plating=Gold, Gain Bandwidth Product=3MHz, Lead Free="Lead Free", Manufacturer Part Number=TL084CPWR, Max I/O Voltage=15mV, Max Supply Voltage=18V, Nominal Gain Bandwidth Product=3MHz, Number of Amplifiers=4, Number of Channels=4, Number of Circuits=4, Number of Elements=4, Number of Pins=14, Packaging="Tape and Reel", Pricing 1="1=0.64000, 10=0.54500, 50=0.54500, 100=0.37800, 500=0.32000, 1000=0.24700, 2000=0.22500, 10000=0.22500 (USD)", Radiation Hardening=No, REACH SVHC="No SVHC", RoHS=Yes, RoHS Compliant=Yes, Slew Rate=13V/µs, Stock 1=3, Supplier 1=Mouser, Unity Gain Bandwidth Product=3MHz

## Free pads (board coordinates)
  round 0 hole 1 unplated: MH1(9.41,-27.159) MH1(9.41,-27.159) MH1(23.858,-27.135) MH1(23.863,-27.121) MH1(51.8,-27.07) MH1(51.8,-27.07) MH1(98.521,-26.994) MH1(98.521,-26.994) MH1(145.276,-26.892) MH1(145.276,-26.892) MH1(162.938,-26.842) MH1(162.938,-26.842) MH1(182.096,-26.816) MH1(182.096,-26.816) MH1(199.095,-26.791) MH1(199.095,-26.791) MH2(0,0) MH2(0,0) MH2(14.452,0.038) MH2(14.452,0.038) MH2(42.39,0.089) MH2(42.39,0.089) MH2(89.111,0.165) MH2(89.111,0.165) MH2(135.866,0.267) MH2(135.866,0.267) MH2(153.527,0.318) MH2(153.527,0.318) MH2(172.686,0.343) MH2(172.686,0.343) MH2(189.685,0.369) MH2(189.685,0.369)
  round 0 hole 1.5 unplated: MH1(108.128,100.143) MH2(85.167,88.637)

## Via types
v1: diameter 0.6, hole 0.3, Top Layer to Bottom Layer, tented both sides, 464 vias
v2: diameter 0.35, hole 0.2, Top Layer to Bottom Layer, 46 vias

## Nets (pads, with @x,y where several pads share a name; then routed paths per layer and width w, separated by ;. In a path a pad name is that pad's centre, name@x,y a point inside that pad or via, vN(x,y) a via of type N, cw(c..) or ccw(c..) an arc to the next point about the centre after c; other vN are vias at no path point)
#rg_U1_OpAmp_Sheet: R2_U1_OpAmp_Sheet.2 U1_U1_OpAmp_Sheet.2
#rg_U2_OpAmp_Sheet: R2_U2_OpAmp_Sheet.2 U1_U2_OpAmp_Sheet.2
#rg_U3_OpAmp_Sheet: R2_U3_OpAmp_Sheet.2 U1_U3_OpAmp_Sheet.2
#rg_U4_OpAmp_Sheet: R2_U4_OpAmp_Sheet.2 U1_U4_OpAmp_Sheet.2
#rg_U5_OpAmp_Sheet: R2_U5_OpAmp_Sheet.2 U1_U5_OpAmp_Sheet.2
#rg_U6_OpAmp_Sheet: R2_U6_OpAmp_Sheet.2 U1_U6_OpAmp_Sheet.2
#rg_U7_OpAmp_Sheet: R2_U7_OpAmp_Sheet.2 U1_U7_OpAmp_Sheet.2
#rg_U_OpAmp_Sheet: R2_U_OpAmp_Sheet.2 U1_U_OpAmp_Sheet.2
*rg_U1_OpAmp_Sheet: R2_U1_OpAmp_Sheet.1 U1_U1_OpAmp_Sheet.3
*rg_U2_OpAmp_Sheet: R2_U2_OpAmp_Sheet.1 U1_U2_OpAmp_Sheet.3
*rg_U3_OpAmp_Sheet: R2_U3_OpAmp_Sheet.1 U1_U3_OpAmp_Sheet.3
*rg_U4_OpAmp_Sheet: R2_U4_OpAmp_Sheet.1 U1_U4_OpAmp_Sheet.3
*rg_U5_OpAmp_Sheet: R2_U5_OpAmp_Sheet.1 U1_U5_OpAmp_Sheet.3
*rg_U6_OpAmp_Sheet: R2_U6_OpAmp_Sheet.1 U1_U6_OpAmp_Sheet.3
*rg_U7_OpAmp_Sheet: R2_U7_OpAmp_Sheet.1 U1_U7_OpAmp_Sheet.3
*rg_U_OpAmp_Sheet: R2_U_OpAmp_Sheet.1 U1_U_OpAmp_Sheet.3
-VCC_3V3: C4_U1_OpAmp_Sheet.1 C4_U2_OpAmp_Sheet.1 C4_U3_OpAmp_Sheet.1 C4_U4_OpAmp_Sheet.1 C4_U5_OpAmp_Sheet.1 C4_U6_OpAmp_Sheet.1 C4_U7_OpAmp_Sheet.1 C4_U7_OpAmp_Sheet_1.1 C4_U_OpAmp_Sheet.1 C5_U1_OpAmp_Sheet.1 C5_U2_OpAmp_Sheet.1 C5_U3_OpAmp_Sheet.1 C5_U4_OpAmp_Sheet.1 C5_U5_OpAmp_Sheet.1 C5_U6_OpAmp_Sheet.1 C5_U7_OpAmp_Sheet.1 C5_U7_OpAmp_Sheet_1.1 C5_U_OpAmp_Sheet.1 SB1_U1_OpAmp_Sheet.2 SB1_U2_OpAmp_Sheet.2 SB1_U3_OpAmp_Sheet.2 SB1_U4_OpAmp_Sheet.2 SB1_U5_OpAmp_Sheet.2 SB1_U6_OpAmp_Sheet.2 SB1_U7_OpAmp_Sheet.2 SB1_U7_OpAmp_Sheet_1.2 SB1_U_OpAmp_Sheet.2 SB4_U1_OpAmp_Sheet.1 SB4_U2_OpAmp_Sheet.1 SB4_U3_OpAmp_Sheet.1 SB4_U4_OpAmp_Sheet.1 SB4_U5_OpAmp_Sheet.1 SB4_U6_OpAmp_Sheet.1 SB4_U7_OpAmp_Sheet.1 SB4_U7_OpAmp_Sheet_1.1 SB4_U_OpAmp_Sheet.1 SB6_U1_OpAmp_Sheet.2 SB6_U2_OpAmp_Sheet.2 SB6_U3_OpAmp_Sheet.2 SB6_U4_OpAmp_Sheet.2 SB6_U5_OpAmp_Sheet.2 SB6_U6_OpAmp_Sheet.2 SB6_U7_OpAmp_Sheet.2 SB6_U7_OpAmp_Sheet_1.2 SB6_U_OpAmp_Sheet.2 U1_U1_OpAmp_Sheet.5 U1_U2_OpAmp_Sheet.5 U1_U3_OpAmp_Sheet.5 U1_U4_OpAmp_Sheet.5 U1_U5_OpAmp_Sheet.5 U1_U6_OpAmp_Sheet.5 U1_U7_OpAmp_Sheet.5 U1_U_OpAmp_Sheet.5 U2_U1_OpAmp_Sheet.11 U2_U2_OpAmp_Sheet.11 U2_U3_OpAmp_Sheet.11 U2_U4_OpAmp_Sheet.11 U2_U5_OpAmp_Sheet.11 U2_U6_OpAmp_Sheet.11 U2_U7_OpAmp_Sheet.11 U2_U_OpAmp_Sheet.11 | length 433.7
  Top Layer w0.305: v1(9.304,-9.126) 10.211,-8.219 10.211,-5.385 10.742,-4.853 v1@10.742,-4.396 ; v1@23.694,-9.151 24.6,-8.244 24.6,-5.41 25.132,-4.878 25.132,-4.421 v1(25.134,-4.419) ; v1(51.685,-9.034) 52.592,-8.128 52.592,-5.293 53.124,-4.762 53.124,-4.304 v1(53.126,-4.302) ; v1(145.17,-8.859) 146.077,-7.952 146.077,-5.118 146.608,-4.586 146.608,-4.129 v1(146.61,-4.127) ; v1(162.831,-8.808) 163.738,-7.902 163.738,-5.067 164.269,-4.536 164.269,-4.078 v1(164.271,-4.076) ; v1(181.99,-8.783) 182.897,-7.876 182.897,-5.042 183.428,-4.51 183.428,-4.053 v1(183.43,-4.051) ; v1(198.989,-8.758) 199.896,-7.851 199.896,-5.016 200.427,-4.485 200.427,-4.028 v1(200.429,-4.026)
  Top Layer w0.508: v1(5.054,-9.525) 5.453,-9.126 v1(9.304,-9.126) ; v1@19.444,-9.55 19.843,-9.151 v1@23.694,-9.151 ; v1(47.435,-9.433) 47.834,-9.034 v1(51.685,-9.034) ; v1(140.92,-9.258) 141.319,-8.859 v1(145.17,-8.859) ; v1(158.581,-9.207) 158.98,-8.808 v1(162.831,-8.808) ; v1(177.74,-9.182) 178.139,-8.783 v1(181.99,-8.783) ; v1(194.739,-9.156) 195.138,-8.758 v1(198.989,-8.758)
  Top Layer w0.559: v1(6.528,-28.981) 2.159,-28.981 -0.711,-26.111 -0.711,-20.676 1.88,-18.085 7.328,-18.085 v1(9.068,-19.825) ; v1@20.917,-29.006 16.549,-29.006 13.678,-26.136 13.678,-20.7 16.269,-18.11 21.718,-18.11 v1@23.457,-19.849 ; v1(48.909,-28.89) 44.54,-28.89 41.67,-26.019 41.67,-20.584 44.261,-17.993 49.709,-17.993 v1(51.449,-19.733) ; v1(95.624,-28.8) 91.256,-28.8 88.385,-25.93 88.385,-20.494 90.976,-17.903 96.424,-17.903 v1(98.164,-19.643) ; v1(142.394,-28.714) 138.025,-28.714 135.155,-25.844 135.155,-20.409 137.746,-17.818 143.194,-17.818 v1(144.934,-19.558) ; v1(160.055,-28.664) 155.686,-28.664 152.816,-25.793 152.816,-20.358 155.407,-17.767 160.855,-17.767 v1(162.595,-19.507) ; v1(179.214,-28.638) 174.845,-28.638 171.975,-25.768 171.975,-20.332 174.566,-17.742 180.014,-17.742 v1(181.754,-19.482) ; v1(196.213,-28.613) 191.844,-28.613 188.974,-25.743 188.974,-20.307 191.565,-17.716 197.013,-17.716 v1(198.753,-19.456)
  Bottom Layer w0.254: 5.447,-3.583 5.447,-4.584 5.69,-4.826 9.886,-4.826 10.43,-4.283 10.43,-4.102 ; C5_U1_OpAmp_Sheet.1@23.705,-10.224 C5_U1_OpAmp_Sheet.1@23.794,-10.224 ; 47.837,-3.494 47.837,-4.494 48.13,-4.788 52.276,-4.788 52.819,-4.244 52.819,-4.013 ; C5_U2_OpAmp_Sheet.1@51.648,-10.16 C5_U2_OpAmp_Sheet.1@51.737,-10.16 ; 94.558,-3.418 94.558,-4.418 94.851,-4.711 98.997,-4.711 99.54,-4.168 99.54,-3.937 ; C5_U3_OpAmp_Sheet.1@98.369,-10.084 C5_U3_OpAmp_Sheet.1@98.458,-10.084 ; 141.313,-3.316 141.313,-4.317 141.606,-4.61 145.752,-4.61 146.296,-4.067 146.296,-3.835 ; C5_U4_OpAmp_Sheet.1@145.124,-9.982 C5_U4_OpAmp_Sheet.1@145.213,-9.982 ; 158.974,-3.265 158.974,-4.266 159.267,-4.559 163.413,-4.559 163.957,-4.016 163.957,-3.784 ; C5_U5_OpAmp_Sheet.1@162.785,-9.931 C5_U5_OpAmp_Sheet.1@162.874,-9.931 ; 178.133,-3.24 178.133,-4.24 178.426,-4.534 182.572,-4.534 183.115,-3.99 183.115,-3.759 ; C5_U6_OpAmp_Sheet.1@181.944,-9.906 C5_U6_OpAmp_Sheet.1@182.033,-9.906 ; 195.132,-3.215 195.132,-4.215 195.425,-4.508 199.571,-4.508 200.115,-3.965 200.115,-3.734 ; C5_U7_OpAmp_Sheet_1.1@198.943,-9.88 C5_U7_OpAmp_Sheet_1.1@199.032,-9.881
  Bottom Layer w0.305: 6.451,-19.507 SB6_U_OpAmp_Sheet.2@6.451,-13.767 ; U2_U_OpAmp_Sheet.11@8.191,-10.408 C5_U_OpAmp_Sheet.1@9.176,-10.408 ; 20.898,-19.483 SB6_U1_OpAmp_Sheet.2@20.898,-13.742 ; U2_U1_OpAmp_Sheet.11@22.606,-10.415 22.638,-10.383 23.623,-10.383 C5_U1_OpAmp_Sheet.1@23.744,-10.263 ; 48.841,-19.418 SB6_U2_OpAmp_Sheet.2@48.841,-13.678 ; U2_U2_OpAmp_Sheet.11@50.549,-10.35 50.58,-10.319 51.565,-10.319 C5_U2_OpAmp_Sheet.1@51.686,-10.198 ; 95.562,-19.342 SB6_U3_OpAmp_Sheet.2@95.562,-13.601 ; U2_U3_OpAmp_Sheet.11@97.27,-10.274 97.302,-10.242 98.287,-10.242 C5_U3_OpAmp_Sheet.1@98.407,-10.122 ; 142.317,-19.24 SB6_U4_OpAmp_Sheet.2@142.317,-13.5 ; U2_U4_OpAmp_Sheet.11@144.025,-10.172 144.057,-10.141 145.042,-10.141 C5_U4_OpAmp_Sheet.1@145.162,-10.02 ; 159.978,-19.189 SB6_U5_OpAmp_Sheet.2@159.978,-13.449 ; U2_U5_OpAmp_Sheet.11@161.686,-10.122 161.718,-10.09 162.703,-10.09 C5_U5_OpAmp_Sheet.1@162.824,-9.969 ; 179.137,-19.164 SB6_U6_OpAmp_Sheet.2@179.137,-13.424 ; U2_U6_OpAmp_Sheet.11@180.845,-10.096 180.877,-10.065 181.862,-10.065 C5_U6_OpAmp_Sheet.1@181.982,-9.944 ; 196.136,-19.139 SB6_U7_OpAmp_Sheet_1.2@196.136,-13.398 ; U2_U7_OpAmp_Sheet.11@197.844,-10.071 197.876,-10.039 198.861,-10.039 C5_U7_OpAmp_Sheet_1.1@198.981,-9.918
  Bottom Layer w0.381: v1(5.054,-9.525) 5.054,-10.744 6.49,-12.179 SB6_U_OpAmp_Sheet.2@6.49,-13.64 ; v1@19.501,-9.501 19.501,-10.719 20.937,-12.155 SB6_U1_OpAmp_Sheet.2@20.937,-13.615 ; v1@47.444,-9.436 47.444,-10.655 48.879,-12.09 SB6_U2_OpAmp_Sheet.2@48.879,-13.551 ; v1@94.165,-9.36 94.165,-10.578 95.601,-12.014 SB6_U3_OpAmp_Sheet.2@95.601,-13.475 ; v1(140.92,-9.258) 140.92,-10.477 142.356,-11.912 SB6_U4_OpAmp_Sheet.2@142.356,-13.373 ; v1(158.581,-9.207) 158.581,-10.426 160.017,-11.862 SB6_U5_OpAmp_Sheet.2@160.017,-13.322 ; v1(177.74,-9.182) 177.74,-10.401 179.176,-11.836 SB6_U6_OpAmp_Sheet.2@179.176,-13.297 ; v1(194.739,-9.156) 194.739,-10.375 196.175,-11.811 SB6_U7_OpAmp_Sheet_1.2@196.175,-13.271
  Bottom Layer w0.508: C5_U_OpAmp_Sheet.1@9.296,-10.287 v1@9.296,-9.134 ; 10.166,-3.521 10.318,-3.674 ; C5_U1_OpAmp_Sheet.1@23.744,-10.263 v1@23.744,-9.109 ; C5_U2_OpAmp_Sheet.1@51.686,-10.198 v1@51.686,-9.045 ; 52.555,-3.432 52.708,-3.585 ; C5_U3_OpAmp_Sheet.1@98.407,-10.122 v1@98.407,-8.968 ; 99.277,-3.356 99.429,-3.508 ; C5_U4_OpAmp_Sheet.1@145.162,-10.02 v1@145.162,-8.867 ; 146.032,-3.254 146.184,-3.407 ; C5_U5_OpAmp_Sheet.1@162.824,-9.969 v1@162.824,-8.816 ; 163.693,-3.204 163.845,-3.356 ; C5_U6_OpAmp_Sheet.1@181.982,-9.944 v1@181.982,-8.791 ; 182.852,-3.178 183.004,-3.331 ; C5_U7_OpAmp_Sheet_1.1@198.981,-9.918 v1@198.981,-8.765 ; 199.851,-3.153 200.003,-3.305
  Bottom Layer w0.559: v1(20.975,-28.957) v1@20.983,-28.949 ; 20.983,-27.501 21,-27.484 ; v1(48.917,-28.892) v1@48.925,-28.884 ; 48.925,-27.437 48.943,-27.419 ; v1@95.639,-28.816 v1@95.647,-28.808 ; 95.647,-27.36 95.664,-27.343 ; v1(142.394,-28.714) v1@142.402,-28.707 ; 142.402,-27.259 142.419,-27.241 ; v1(160.055,-28.664) v1@160.063,-28.656 ; 160.063,-27.208 160.08,-27.19 ; v1(179.214,-28.638) v1@179.222,-28.63 ; 179.222,-27.183 179.239,-27.165 ; v1(196.213,-28.613) v1@196.221,-28.605 ; 196.221,-27.157 196.238,-27.14
  Bottom Layer w0.635: v1@6.536,-28.974 6.536,-27.526 ; v1@20.983,-28.949 20.983,-27.501 ; v1@48.925,-28.884 48.925,-27.437 ; v1@95.647,-28.808 95.647,-27.36 ; v1@142.402,-28.707 142.402,-27.259 ; v1@160.063,-28.656 160.063,-27.208 ; v1@179.222,-28.63 179.222,-27.183 ; v1@196.221,-28.605 196.221,-27.157
  other v1: 6.528,-28.981 20.975,-28.957 95.624,-28.8 142.394,-28.714 160.055,-28.664 179.214,-28.638 196.213,-28.613 23.452,-19.863 23.452,-19.863 9.068,-19.825 51.449,-19.733 98.164,-19.643 144.934,-19.558 162.595,-19.507 181.754,-19.482 198.753,-19.456 19.439,-9.564 19.439,-9.564 5.054,-9.525 47.435,-9.433 94.151,-9.344 94.151,-9.344 140.92,-9.258 158.581,-9.207 177.74,-9.182 23.689,-9.165 23.689,-9.165 194.739,-9.156 9.304,-9.126 51.685,-9.034 98.4,-8.945 98.4,-8.945 145.17,-8.859 162.831,-8.808 181.99,-8.783 198.989,-8.758 25.134,-4.419 10.744,-4.394 10.744,-4.394 53.126,-4.302 99.841,-4.213 99.841,-4.213 146.61,-4.127 164.271,-4.076 183.43,-4.051 200.429,-4.026
END_U1_OpAmp_Sheet: P2_U1_OpAmp_Sheet.1 U1_U1_OpAmp_Sheet.4 | length 3
  Top Layer w0.559: P2_U1_OpAmp_Sheet.1@19.088,-21.335 19.095,-21.342 P2_U1_OpAmp_Sheet.1@19.095,-23.592
  Bottom Layer w0.559: U1_U1_OpAmp_Sheet.4@16.623,-19.686 U1_U1_OpAmp_Sheet.4@17.385,-19.686
  other v1: 17.323,-19.749 17.323,-19.749
END_U2_OpAmp_Sheet: P2_U2_OpAmp_Sheet.1 U1_U2_OpAmp_Sheet.4 | length 3
  Top Layer w0.559: P2_U2_OpAmp_Sheet.1@47.08,-21.219 47.087,-21.226 P2_U2_OpAmp_Sheet.1@47.087,-23.475
  Bottom Layer w0.559: U1_U2_OpAmp_Sheet.4@44.566,-19.621 U1_U2_OpAmp_Sheet.4@45.328,-19.621
  other v1: 45.319,-19.619 45.319,-19.619
END_U3_OpAmp_Sheet: P2_U3_OpAmp_Sheet.1 U1_U3_OpAmp_Sheet.4 | length 3
  Top Layer w0.559: P2_U3_OpAmp_Sheet.1@93.795,-21.129 93.802,-21.136 P2_U3_OpAmp_Sheet.1@93.802,-23.385
  Bottom Layer w0.559: U1_U3_OpAmp_Sheet.4@91.287,-19.545 U1_U3_OpAmp_Sheet.4@92.049,-19.545
  other v1: 92.035,-19.529 92.035,-19.529
END_U4_OpAmp_Sheet: P2_U4_OpAmp_Sheet.1 P2_U4_OpAmp_Sheet_1.1 U1_U4_OpAmp_Sheet.4 | length 3
  Top Layer w0.559: P2_U4_OpAmp_Sheet_1.1@140.564,-21.044 140.571,-21.05 P2_U4_OpAmp_Sheet_1.1@140.571,-23.3
  Bottom Layer w0.559: U1_U4_OpAmp_Sheet.4@138.042,-19.443 v1(138.804,-19.443)
  other v1: 138.804,-19.443
END_U5_OpAmp_Sheet: P2_U5_OpAmp_Sheet.1 P2_U5_OpAmp_Sheet_1.1 U1_U5_OpAmp_Sheet.4 | length 3
  Top Layer w0.559: P2_U5_OpAmp_Sheet_1.1@158.226,-20.993 158.232,-21 P2_U5_OpAmp_Sheet_1.1@158.232,-23.249
  Bottom Layer w0.559: U1_U5_OpAmp_Sheet.4@155.703,-19.393 v1(156.465,-19.393)
  other v1: 156.465,-19.393
END_U6_OpAmp_Sheet: P2_U6_OpAmp_Sheet.1 P2_U6_OpAmp_Sheet_1.1 U1_U6_OpAmp_Sheet.4 | length 3
  Top Layer w0.559: P2_U6_OpAmp_Sheet_1.1@177.384,-20.967 177.391,-20.974 P2_U6_OpAmp_Sheet_1.1@177.391,-23.224
  Bottom Layer w0.559: U1_U6_OpAmp_Sheet.4@174.862,-19.367 v1(175.624,-19.367)
  other v1: 175.624,-19.367
END_U7_OpAmp_Sheet: P2_U7_OpAmp_Sheet.1 P2_U7_OpAmp_Sheet_1.1 U1_U7_OpAmp_Sheet.4 | length 3
  Top Layer w0.559: P2_U7_OpAmp_Sheet_1.1@194.383,-20.942 194.39,-20.949 P2_U7_OpAmp_Sheet_1.1@194.39,-23.198
  Bottom Layer w0.559: U1_U7_OpAmp_Sheet.4@191.861,-19.342 v1(192.623,-19.342)
  other v1: 192.623,-19.342
END_U_OpAmp_Sheet: P2_U_OpAmp_Sheet.1 U1_U_OpAmp_Sheet.4 | length 0.8
  Bottom Layer w0.559: U1_U_OpAmp_Sheet.4@2.176,-19.71 v1(2.938,-19.71)
  other v1: 2.938,-19.71
GND: P#3.4 P#3.8 P#3.12 P#3.16 P#3.20 P#3.24 P#3.28 P#3.32 R1_U1_OpAmp_Sheet.1 R1_U2_OpAmp_Sheet.1 R1_U3_OpAmp_Sheet.1 R1_U4_OpAmp_Sheet.1 R1_U5_OpAmp_Sheet.1 R1_U6_OpAmp_Sheet.1 R1_U7_OpAmp_Sheet.1 R1_U7_OpAmp_Sheet_1.1 R1_U_OpAmp_Sheet.1 SB3_U1_OpAmp_Sheet.2 SB3_U2_OpAmp_Sheet.2 SB3_U3_OpAmp_Sheet.2 SB3_U4_OpAmp_Sheet.2 SB3_U5_OpAmp_Sheet.2 SB3_U6_OpAmp_Sheet.2 SB3_U7_OpAmp_Sheet.2 SB3_U7_OpAmp_Sheet_1.2 SB3_U_OpAmp_Sheet.2 SB4_U1_OpAmp_Sheet.2 SB4_U2_OpAmp_Sheet.2 SB4_U3_OpAmp_Sheet.2 SB4_U4_OpAmp_Sheet.2 SB4_U5_OpAmp_Sheet.2 SB4_U6_OpAmp_Sheet.2 SB4_U7_OpAmp_Sheet.2 SB4_U7_OpAmp_Sheet_1.2 SB4_U_OpAmp_Sheet.2 | length 1038.2
  Top Layer w0.254: v2@104.199,85.406 105.901,87.108 v2(105.901,90.975) v2(105.901,96.547)
  Top Layer w0.381: v2@85.017,95.536 86.452,95.536 87.252,94.736 v2(87.252,89.663) v2(92.972,89.663) v2(98.56,89.663) ; v2@85.022,95.541 v2(85.022,98.351)
  Bottom Layer w0.254: R1_U_OpAmp_Sheet.1@-0.838,-1.537 0.77,-1.537 3.955,1.648 3.955,2.159 ; 3.963,1.648 3.963,20.855 3.86,28.144 3.86,33.924 cw(c72.932,29.311) 67.853,98.351 v2@85.012,98.351 ; R1_U1_OpAmp_Sheet.1@13.614,-1.499 16.4,-1.499 18.407,0.508 ; 18.354,32.188 18.354,26.982 18.415,18.365 18.415,0.508 ; 18.354,32.202 cw(c82.128,28.909) 82.65,92.766 ; 46.352,4.599 46.352,15.597 46.272,22.353 46.272,27.277 cw(c78.12,24.762) 66.693,54.596 ; 66.694,54.596 ccw(c55.108,84.824) 81.782,66.482 ccw(c56.152,84.106) 87.257,84.106 v2@87.257,89.663 ; 82.651,92.766 84.665,92.766 85.012,93.113 v2(85.012,95.531) ; v2(85.022,98.351) 86.47,98.351 88.428,100.308 v2(88.428,100.929) ; v2(90.409,100.89) 90.415,100.896 P#3.4@90.415,104.085 ; v2(92.415,100.896) 92.421,100.902 P#3.8@92.421,104.09 ; v2@92.965,89.656 92.965,17.048 93.074,12.31 93.074,4.675 ; v2@94.421,100.902 P#3.12@94.421,104.09 ; v2(96.409,100.89) 96.415,100.896 P#3.16@96.415,104.085 ; v2(98.415,100.896) 98.421,100.902 P#3.20@98.421,104.09 ; v2@98.56,89.638 98.56,82.424 ccw(c128.251,82.422) 103.787,65.598 ccw(c134.281,86.568) 111.37,57.504 ccw(c127.917,78.494) 118.345,53.539 ; v2(100.409,100.89) 100.415,100.896 P#3.24@100.415,104.085 ; v2@102.398,100.89 102.415,100.873 102.415,97.449 103.317,96.547 v2(105.901,96.547) 112.147,96.547 cw(c113.082,15.809) 187.682,46.7 189.388,42.02 ; v2(102.415,100.896) 102.421,100.902 P#3.28@102.421,104.09 ; v2@104.193,85.39 ccw(c133.02,84.502) 110.929,65.96 ; v2@104.421,100.902 P#3.32@104.421,104.09 ; v2(105.901,90.975) 111.909,90.975 ; 110.934,65.954 ccw(c137.191,86.239) 131.249,53.595 ; 111.916,90.974 cw(c109.758,24.014) 176.563,29.058 ; 118.346,53.539 cw(c106.388,22.306) 139.729,24.916 ; 131.265,53.593 cw(c129.541,38.101) 133.566,53.16 cw(c125.18,21.774) 157.408,25.867 157.408,21.718 157.49,18.457 157.49,4.827 ; 139.73,24.897 139.73,18.723 139.829,15.157 139.829,4.776 ; 176.564,29.04 176.564,23.547 176.649,18.482 176.649,4.853 ; 189.393,42.005 191.292,35.572 ; 191.298,35.55 192.614,29.069 ; 192.618,29.049 193.378,22.893 ; 193.379,22.88 193.555,20.482 ; 193.556,20.465 193.582,14.352 193.648,10.712 193.648,4.878
  Bottom Layer w0.508: 48.435,-1.155 49.016,-1.155 ; 95.156,-1.079 95.737,-1.079 ; 178.731,-0.901 179.312,-0.901 ; 195.73,-0.876 196.312,-0.876
  other v2: 104.199,85.396 94.415,100.896 104.415,100.896
IN2N_U1_OpAmp_Sheet: R3_U1_OpAmp_Sheet.1 R7_U1_OpAmp_Sheet.1 U2_U1_OpAmp_Sheet.6 | length 3.6
  Bottom Layer w0.254: R7_U1_OpAmp_Sheet.1@13.761,-9.818 14.003,-9.818 14.142,-9.678 14.706,-9.115 U2_U1_OpAmp_Sheet.6@17.056,-9.115
IN2N_U2_OpAmp_Sheet: R3_U2_OpAmp_Sheet.1 R7_U2_OpAmp_Sheet.1 U2_U2_OpAmp_Sheet.6
IN2N_U3_OpAmp_Sheet: R3_U3_OpAmp_Sheet.1 R7_U3_OpAmp_Sheet.1 U2_U3_OpAmp_Sheet.6 | length 3.6
  Bottom Layer w0.254: R7_U3_OpAmp_Sheet.1@88.425,-9.678 88.666,-9.677 88.806,-9.537 89.37,-8.974 U2_U3_OpAmp_Sheet.6@91.72,-8.974
IN2N_U4_OpAmp_Sheet: R3_U4_OpAmp_Sheet.1 R7_U4_OpAmp_Sheet.1 U2_U4_OpAmp_Sheet.6 | length 3.6
  Bottom Layer w0.254: R7_U4_OpAmp_Sheet.1@135.18,-9.576 135.422,-9.576 135.561,-9.436 136.125,-8.872 U2_U4_OpAmp_Sheet.6@138.475,-8.872
IN2N_U5_OpAmp_Sheet: R3_U5_OpAmp_Sheet.1 R7_U5_OpAmp_Sheet.1 U2_U5_OpAmp_Sheet.6 | length 3.6
  Bottom Layer w0.254: R7_U5_OpAmp_Sheet.1@152.841,-9.525 153.083,-9.525 153.222,-9.385 153.786,-8.822 U2_U5_OpAmp_Sheet.6@156.136,-8.821
IN2N_U6_OpAmp_Sheet: R3_U6_OpAmp_Sheet.1 R7_U6_OpAmp_Sheet.1 U2_U6_OpAmp_Sheet.6 | length 3.6
  Bottom Layer w0.254: R7_U6_OpAmp_Sheet.1@172,-9.499 172.241,-9.499 172.381,-9.36 172.945,-8.796 U2_U6_OpAmp_Sheet.6@175.295,-8.796